# Altium PCB PCB_HDMI_To_FPC-v1.0.PcbDoc (part 3 of 3)
Units mil, origin at the board's own origin, x right, y up, seen from the top; angles counter-clockwise.
Board outline 2043 x 1400 mil, 2 copper layers (Top Layer, Bottom Layer), stack 61.811 mil thick; 121 components, 92 nets, 483 pads, 226 vias.
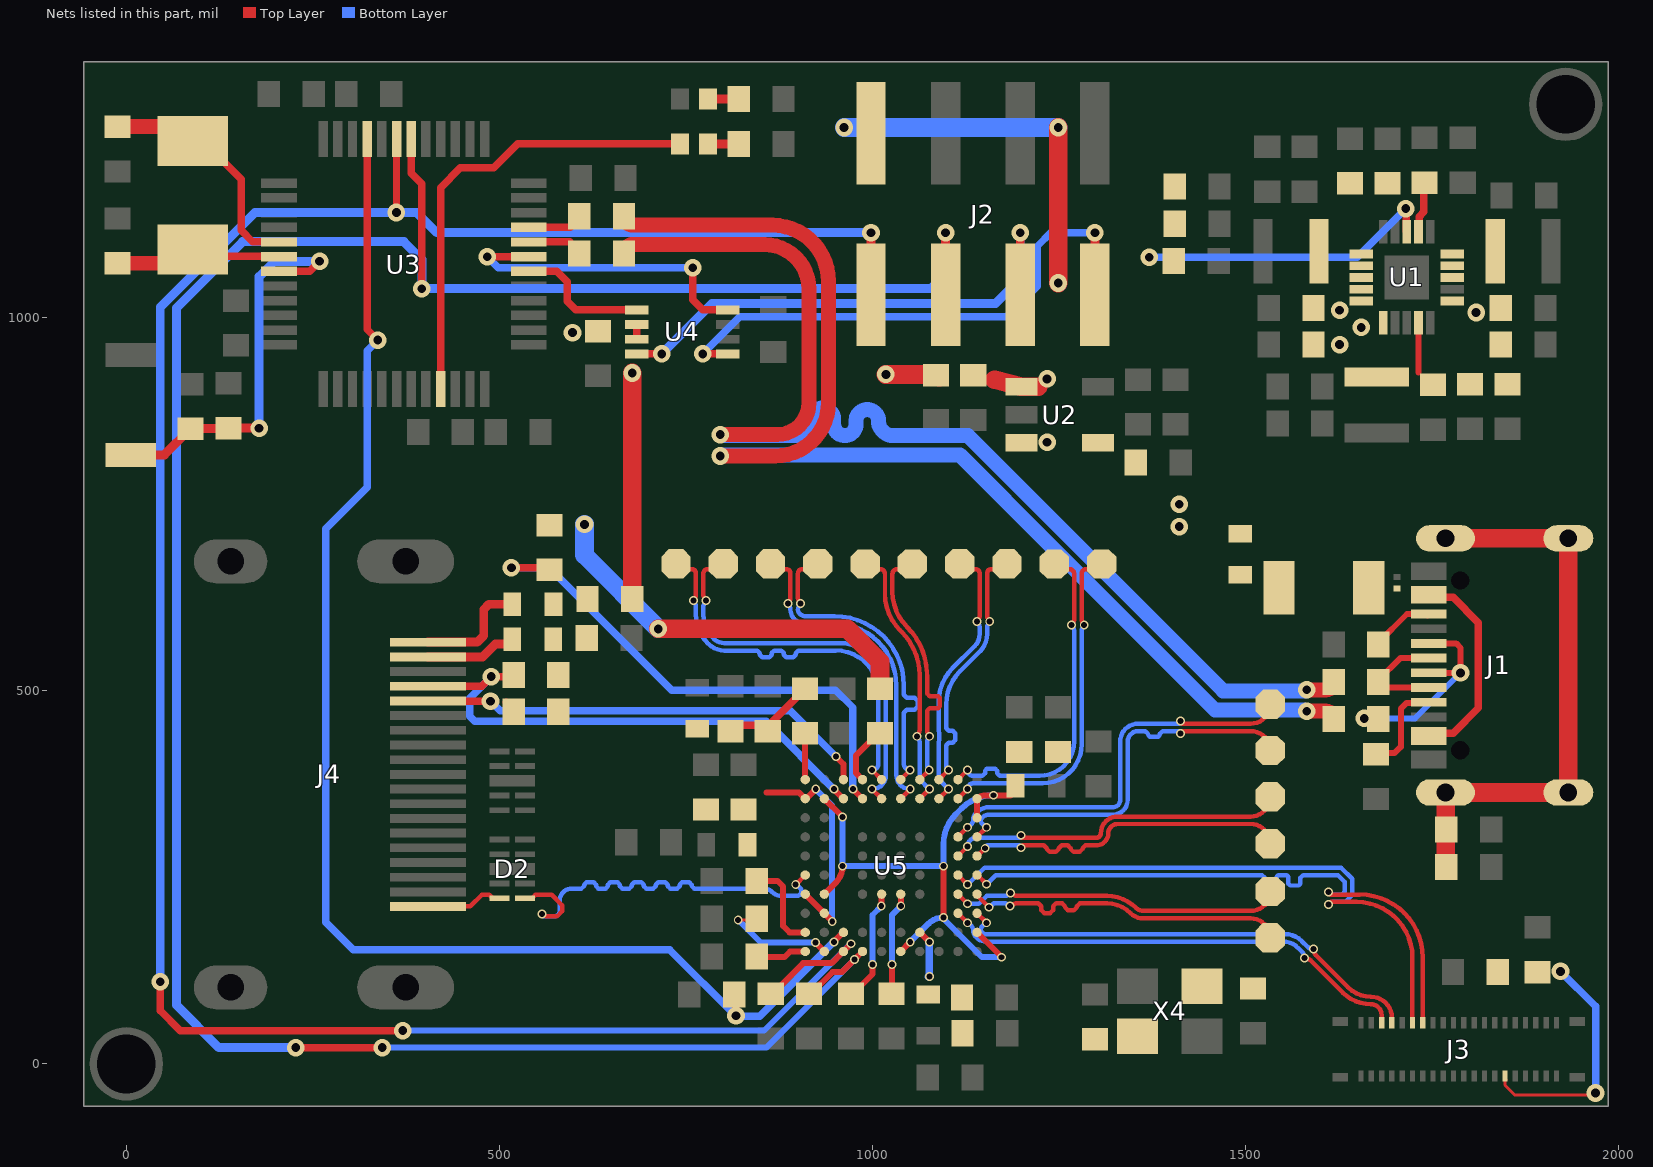
[diagram p2: the nets of this part, all layers, seen from the top]

## Via types
v1: diameter 23.62, hole 11.81, Top Layer to Bottom Layer, tented both sides, 130 vias
v2: diameter 11.81, hole 7.87, Top Layer to Bottom Layer, tented both sides, 96 vias

## Nets (pads, with @x,y where several pads share a name; then routed paths per layer and width w, separated by ;. In a path a pad name is that pad's centre, name@x,y a point inside that pad or via, vN(x,y) a via of type N, cw(c..) or ccw(c..) an arc to the next point about the centre after c; other vN are vias at no path point) (continued)
HDMID2_P: D2.5 D2.6 J4.1 U5.F1 | length 661.1
  Top Layer w6: J4.1@404.63,211.12 460.97,211.12 476.63,226.79 486.2,226.79 489.71,223.27 489.71,222.88 490.65,221.94 D2.5@500,221.94 ; D2.6@534.45,221.94 543.68,221.94 548.34,226.6 560.14,226.6 560.33,226.79 570,226.79 584,212.79 584,204.51 577.08,197.59 561.98,197.59 558.57,201 v2(557,201) ; v2(897.07,240.25) U5.F1@909.87,253.05
  Bottom Layer w6: v2(557,201) ccw(c560.41,201) 560.41,197.59 573,197.59 ccw(c573,205.59) 581,205.59 581,219.03 cw(c596.92,219.03) 585.66,230.29 585.73,230.36 cw(c596.94,219.15) 596.94,235 607,235 610,235 613.52,238.51 613.52,240.24 616.72,243.44 626.32,243.44 629.52,240.24 629.52,238.2 632.72,235 642.32,235 645.52,238.2 645.52,240.24 648.72,243.44 658.32,243.44 661.52,240.24 661.52,238.2 664.72,235 674.32,235 677.52,238.2 677.52,240.24 680.72,243.44 690.32,243.44 693.52,240.24 693.52,238.2 696.72,235 706.32,235 709.52,238.2 709.52,240.24 712.72,243.44 722.32,243.44 725.52,240.24 725.52,238.2 728.72,235 738.32,235 741.52,238.2 741.52,240.24 744.72,243.44 754.32,243.44 757.52,240.24 757.52,238.51 761.03,235 776.6,235 854.02,235 cw(c854.02,218.52) 865.68,230.17 ccw(c877.33,241.83) 877.33,225.35 898.87,225.35 ccw(c898.87,231.35) 903.11,227.1 ccw(c898.87,231.35) 904.87,231.35 ccw(c898.87,231.35) 903.11,235.59 899.42,239.28 ccw(c897.07,236.93) v2(897.07,240.25)
HPDI: R33.1 U5.A4 | length 80.3
  Top Layer w8: U5.A4@986.64,381 978,389.64 978,413.5 1007.5,443 R33.1@1010,443
HPDO: L5.2 R32.1 U5.B4 | length 715.2
  Top Layer w8: v2(973.84,368.21) U5.B4@986.64,355.41
  Top Layer w10: v1(516,665) 564,665 R32.1@567,662
  Bottom Layer w10: v1(516,665) 566.8,665 730.8,501 950.43,501 973.84,477.59 v2(973.84,368.21)
INT: R27.1 U3.45 U5.J3 | length 1906.3
  Top Layer w8: v2(948.25,163.48) U5.J3@961.05,176.28
  Top Layer w10: U3.45@322.79,1239.32 322.79,984.21 v1(337,970) ; R27.1@814.64,93.05 817,90.69 v1(817,64.43)
  Bottom Layer w10: v1(337,970) 323,956 323,773 267,717 267,190 304,153 728,153 816.57,64.43 v1(817,64.43) ; v1@817.04,64.04 848.81,64.04 v2(948.25,163.48)
MCU_RX: U3.31 U4.4 | length 432.6
  Top Layer w10: v1(483.76,1081.84) U3.31@539.32,1081.84 ; v1(759,1067) 759,1024 772.47,1010.53 U4.4@806.02,1010.53
  Bottom Layer w10: v1(483.76,1081.84) 498.6,1067 v1(759,1067)
MCU_TX: U3.30 U4.5 | length 181.3
  Top Layer w10: U3.30@539.32,1062.16 576.84,1062.16 591,1048 591,1022 602.47,1010.53 U4.5@683.98,1010.53
MIPI0_D0_N: J3.6 U5.H9 | length 636.7
  Top Layer w6: U5.H9@1114.59,201.87 v2(1127.39,189.07) ; v2(1579,142) ccw(c1581.68,144.68) 1581.68,140.89 cw(c1581.68,133.06) 1587.21,138.6 1630.17,95.65 ccw(c1667.95,133.44) 1667.95,80 ; 1668,80 cw(c1668,65.69) 1682.31,65.69 J3.6@1682.31,55.23
  Bottom Layer w6: v2(1127.39,189.07) cw(c1127.39,185.75) 1129.73,188.1 1131.96,185.87 cw(c1124.18,178.09) 1135.18,178.09 ccw(c1146.18,178.09) 1138.4,170.32 ; 1139.88,168.84 ccw(c1151.56,180.51) 1151.56,164 1550.45,164 cw(c1550.45,136.56) 1569.85,155.96 1576.19,149.63 cw(c1572.07,145.52) 1577.89,145.52 1577.89,144.68 ccw(c1581.68,144.68) v2(1579,142)
MIPI0_D0_P: J3.8 U5.H10 | length 641.2
  Top Layer w6: U5.H10@1140.18,201.87 v2(1152.98,189.07) ; v2(1590.89,153.89) cw(c1588.2,151.2) 1592,151.2 ccw(c1599.83,151.2) 1594.29,145.67 1637.2,102.76 ccw(c1668,133.56) 1668,90 cw(c1668,61.91) 1696.09,61.91 J3.8@1696.09,55.23
  Bottom Layer w6: v2(1152.98,189.07) ccw(c1152.98,185.75) 1150.63,188.1 1146.94,184.41 ccw(c1151.18,180.17) 1145.18,180.17 ccw(c1151.18,180.17) 1146.94,175.92 ccw(c1151.58,180.57) 1151.58,174 1552.52,174 cw(c1552.52,141.56) 1575.46,164.5 1583.26,156.7 ccw(c1587.37,160.81) 1587.37,155 1588.2,155 cw(c1588.2,151.2) v2(1590.89,153.89)
MIPI0_D1_N: P2.1 U5.G9 | length 450.9
  Top Layer w6: U5.G9@1114.59,227.46 v2(1127.39,214.66) ; v2(1185,229) cw(c1185,225.2) 1187.68,227.89 ccw(c1194.43,234.63) 1194.43,225.09 1314.45,225.09 cw(c1314.45,170.53) 1353.03,209.11 1353.07,209.07 ccw(c1362.9,218.9) 1362.9,205 1507,205 ccw(c1507,231) P2.1@1533,231
  Bottom Layer w6: v2(1127.39,214.66) 1142.7,214.66 1153.42,225.37 1179.8,225.37 1183.43,229 v2(1185,229)
MIPI0_D1_P: P1.1 U5.G10 | length 451.5
  Top Layer w6: U5.G10@1140.18,227.46 1140.18,225.84 v2(1156.16,209.87) ; v2(1184.28,211.47) ccw(c1184.28,215.27) 1186.96,212.58 cw(c1193.03,206.51) 1193.03,215.09 1203,215.09 1222,215.09 1226,211.09 1226,206.15 1230,202.15 1238,202.15 1242,206.15 1242,211.09 1246,215.09 1254,215.09 1258,211.09 1258,209.97 1262,205.97 1270,205.97 1274,209.97 1274,211.09 1278,215.09 1304.16,215.09 1314.39,215.09 cw(c1314.39,170.39) 1346,202 1346.06,201.94 ccw(c1362.81,218.69) 1362.81,195 1507,195 cw(c1507,169) P1.1@1533,169
  Bottom Layer w6: v2(1156.16,209.87) 1157.07,209.87 1162.58,215.37 1178.8,215.37 1182.71,211.47 v2(1184.28,211.47)
MIPI0_D2_N: P4.1 U5.E9 | length 465.7
  Top Layer w6: U5.E9@1114.59,278.64 v2(1127.39,291.43) ; v2(1199,306.41) ccw(c1202.41,306.41) 1202.41,303 1300,303 ccw(c1300,309) 1306,309 cw(c1328.5,309) 1328.5,331.5 1506.59,331.5 ccw(c1506.59,358) P4.1@1533.09,358
  Bottom Layer w6: v2(1127.39,291.43) cw(c1138.95,291.43) 1138.95,303 1195.59,303 ccw(c1195.59,306.41) v2(1199,306.41)
MIPI0_D2_P: P3.1 U5.E10 | length 452
  Top Layer w6: U5.E10@1140.18,278.64 1140.41,278.64 1150.77,289 v2(1151,289) ; v2(1199,289.59) cw(c1202.41,289.59) 1202.41,293 1210.48,293 1229.49,293 1233.49,289 1233.49,288.02 1237.49,284.02 1245.49,284.02 1249.49,288.02 1249.49,289 1253.49,293 1261.49,293 1265.49,289 1265.49,288.02 1269.49,284.02 1277.49,284.02 1281.49,288.02 1281.49,289 1285.49,293 1300,293 ccw(c1300,309) 1302.08,293.14 ccw(c1300,309) 1316,309 cw(c1328.5,309) 1328.5,321.5 1506.59,321.5 cw(c1506.59,295) P3.1@1533.09,295
  Bottom Layer w6: v2(1151,289) cw(c1155,289) 1155,293 1195.59,293 cw(c1195.59,289.59) v2(1199,289.59)
MIPI0_D3_N: P6.1 U5.D9 | length 554.4
  Top Layer w6: U5.D9@1114.59,304.23 v2(1127.39,317.03) ; v2(1413,459.41) ccw(c1416.41,459.41) 1416.41,456 1507.09,456 ccw(c1507.09,482) P6.1@1533.09,482
  Bottom Layer w6: v2(1127.39,317.03) ccw(c1127.39,320.34) 1129.73,318 1131.96,320.22 ccw(c1124.18,328) 1135.18,328 cw(c1146.18,328) 1138.4,335.77 ; 1138.4,335.78 1139.89,337.26 cw(c1156.15,321) 1156.15,344 1322,344 ccw(c1322,354) 1332,354 1332,432 cw(c1356,432) 1356,456 1409.59,456 ccw(c1409.59,459.41) v2(1413,459.41)
MIPI0_D3_P: P5.1 U5.D10 | length 546.4
  Top Layer w6: U5.D10@1140.18,304.23 v2(1152.98,317.03) ; v2(1413,442.59) cw(c1416.41,442.59) 1416.41,446 1507.02,446 cw(c1507.02,420) P5.1@1533.02,420
  Bottom Layer w6: v2(1152.98,317.03) cw(c1152.98,320.34) 1150.63,318 1146.94,321.69 cw(c1151.18,325.93) 1145.18,325.93 cw(c1151.18,325.93) 1146.94,330.17 cw(c1156.18,320.93) 1156.18,334 1322,334 ccw(c1322,354) 1342,354 1342,432 cw(c1356,432) 1349.76,444.53 cw(c1356,432) 1352.76,445.62 1356,446 1365.73,446 1369.24,442.49 1369.24,441 1371.64,438.6 1382.84,438.6 1385.24,441 1385.24,442.49 1388.76,446 1391.76,446 1409.59,446 cw(c1409.59,442.59) v2(1413,442.59)
MIPI0_DC_N: J3.12 U5.F9 | length 859.5
  Top Layer w6: U5.F9@1114.59,253.05 v2(1127.39,240.25) ; v2(1611,213.59) cw(c1614.41,213.59) 1614.41,217 1648.86,217 cw(c1648.86,142.2) 1723.65,142.2 1723.65,146.2 ; J3.12@1723.65,55.23 1723.65,145.2
  Bottom Layer w6: v2(1127.39,240.25) 1150.13,263 1628,263 1643,248 1643,226.37 1633.63,217 1615.98,217 1612.57,213.59 v2(1611,213.59)
MIPI0_DC_P: J3.14 U5.F10 | length 859.1
  Top Layer w6: U5.F10@1140.74,253.05 v2(1152.98,240.81) ; v2(1611,230.41) ccw(c1614.41,230.41) 1614.41,227 1653,227 cw(c1653,142.57) 1735.44,160.81 cw(c1653,142.57) 1737.43,142.57 1737.43,146.57 ; J3.14@1737.43,55.23 1737.43,145.57
  Bottom Layer w6: v2(1152.98,240.81) 1153.21,240.81 1165.4,253 1503,253 1522,253 1525.51,249.49 1525.51,241.16 1527.91,238.76 1539.11,238.76 1541.51,241.16 1541.51,250.6 1543.91,253 1555.11,253 1557.51,250.6 1557.51,241.48 1559.91,239.08 1571.11,239.08 1573.51,241.48 1573.51,249.49 1577.03,253 1604,253 1623.86,253 1633,243.86 1633,230.51 1629.49,227 1615.98,227 1612.57,230.41 v2(1611,230.41)
MIPI1_D0_N: P10.1 U5.B9 | length 468.1
  Top Layer w6: U5.B9@1114.59,355.41 v2(1127.39,368.21) ; v2(1283.71,588) ccw(c1279.92,588) 1282.61,590.68 1282.01,591.28 cw(c1286.12,595.39) 1280.31,595.39 1280.31,656.92 cw(c1286.31,656.92) 1282.06,661.17 cw(c1286.31,656.92) 1286.31,662.92 1291.87,662.92 ccw(c1291.87,682.36) 1305.61,668.62 P10.1@1307,670
  Bottom Layer w6: v2(1127.39,368.21) cw(c1135.18,368.21) 1135.18,376 1228,376 ccw(c1228,428.31) 1280.31,428.31 1280.31,579.78 cw(c1288.14,579.78) 1282.6,585.32 ccw(c1279.92,588) v2(1283.71,588)
MIPI1_D0_P: P9.1 U5.A9 | length 462.4
  Top Layer w6: U5.A9@1114.59,381 v2(1127.39,393.8) ; P9.1@1243.61,670 1245,668.62 ccw(c1258.74,682.36) 1258.74,662.92 1264.31,662.92 cw(c1264.31,656.92) 1268.55,661.17 cw(c1264.31,656.92) 1270.31,656.92 1270.31,595.39 cw(c1264.49,595.39) 1268.6,591.28 1268.01,590.68 ccw(c1270.7,588) v2(1266.9,588)
  Bottom Layer w6: v2(1127.39,393.8) ccw(c1135.18,393.8) 1135.18,386 1144.38,386 1147.38,386 1150.9,389.52 1150.9,392.99 1153.3,395.39 1164.5,395.39 1166.9,392.99 1166.9,389.52 1170.41,386 1179.2,386 1223.86,386 ccw(c1223.86,432.45) 1256.09,399 ccw(c1223.86,432.45) 1270.31,432.45 1270.31,579.78 ccw(c1262.48,579.78) 1268.01,585.32 cw(c1270.7,588) v2(1266.9,588)
MIPI1_D1_N: P12.1 U5.B8 | length 365.2
  Top Layer w6: U5.B8@1089,355.41 v2(1101.8,368.21) ; P12.1@1116.94,670.16 1118.32,668.78 ccw(c1132.06,682.52) 1132.06,663.09 1137.63,663.09 cw(c1137.63,657.09) 1141.87,661.33 cw(c1137.63,657.09) 1143.63,657.09 1143.63,600.39 cw(c1137.81,600.39) 1141.93,596.28 1141.33,595.68 ccw(c1144.02,593) v2(1140.22,593)
  Bottom Layer w6: v2(1101.8,368.21) 1090.65,379.35 cw(c1094.89,383.6) 1088.89,383.6 1088.89,427 cw(c1098.89,427) 1088.9,427.43 1089.38,438.44 ccw(c1076.48,439) 1089.38,439.61 1088.9,449.55 cw(c1098.89,450.03) 1088.89,450.03 1088.89,486.14 cw(c1151.05,486.14) 1107.1,530.1 1137,560 ccw(c1121,576) 1143.63,576 1143.63,584.78 ccw(c1135.8,584.78) 1141.33,590.32 cw(c1144.02,593) v2(1140.22,593)
MIPI1_D1_P: P11.1 U5.A8 | length 351.1
  Top Layer w6: U5.A8@1089,381 v2(1101.8,393.8) ; v2@1155.92,595.68 1155.33,596.28 cw(c1159.44,600.39) 1153.63,600.39 1153.63,657.09 cw(c1159.63,657.09) 1155.39,661.33 cw(c1159.63,657.09) 1159.63,663.09 1165.19,663.09 ccw(c1165.19,682.52) 1178.94,668.78 P11.1@1180.32,670.16 ; v2@1155.93,595.68 cw(c1153.24,593) v2(1157.03,593)
  Bottom Layer w6: v2(1101.8,393.8) 1101.8,395.37 1098.89,398.27 1098.89,408 1098.89,427 1102.41,430.52 1107.51,430.52 1110.71,433.72 1110.71,443.32 1107.51,446.52 1102.41,446.52 1098.89,450.03 1098.89,482 cw(c1161.05,482) 1117.1,525.95 1144.13,552.98 ccw(c1121.18,575.92) 1153.63,575.92 1153.63,584.78 cw(c1161.46,584.78) 1155.92,590.32 ccw(c1153.24,593) v2(1157.03,593)
MIPI1_D2_N: P14.1 U5.B6 | length 449.8
  Top Layer w6: P14.1@863.39,670.16 864.78,668.78 ccw(c878.52,682.52) 878.52,663.09 884.09,663.09 cw(c884.09,657.09) 888.33,661.33 cw(c884.09,657.09) 890.09,657.09 890.09,624.39 cw(c884.27,624.39) 888.38,620.28 887.79,619.68 ccw(c890.48,617) v2(886.68,617) ; U5.B6@1037.82,355.41 v2(1050.61,368.21)
  Bottom Layer w6: v2(886.68,617) ccw(c890.48,617) 887.79,614.32 cw(c882.25,608.78) 890.09,608.78 ; 890.09,608.75 ccw(c907.66,608.75) 895.23,596.32 895.34,596.21 ccw(c910.34,611.2) 910.34,590 949.3,590 cw(c949.3,507.3) 1032,507.3 1032,386.82 ccw(c1050.61,386.82) v2(1050.61,368.21)
MIPI1_D2_P: P13.1 U5.A6 | length 445.5
  Top Layer w6: v2(903.49,617) ccw(c899.69,617) 902.39,619.68 901.79,620.28 cw(c905.9,624.39) 900.09,624.39 900.09,657.09 cw(c906.09,657.09) 901.84,661.33 cw(c906.09,657.09) 906.09,663.09 911.65,663.09 ccw(c911.65,682.52) 925.39,668.78 P13.1@926.78,670.16 ; U5.A6@1037.82,381 1037.82,381.22 1050.17,393.58 v2(1050.17,393.8)
  Bottom Layer w6: v2@902.35,614.29 ccw(c907.83,608.82) 900.09,608.82 ccw(c907.83,608.82) 902.35,603.34 ccw(c910.42,611.41) 910.42,600 949.3,600 cw(c949.3,507.3) 1042,507.3 1042,494.68 1046,490.68 1056.41,490.68 1060.41,486.68 1060.41,478.68 1056.41,474.68 1046,474.68 1042,470.68 1042,451.68 1042,401.97 ccw(c1050.17,401.97) v2(1050.17,393.8) ; v2@902.38,614.32 ccw(c899.69,617) v2(903.49,617)
MIPI1_D3_N: P16.1 U5.B5 | length 555
  Top Layer w6: v2(776.79,621) ccw(c772.99,621) 775.68,623.68 775.09,624.28 cw(c779.2,628.39) 773.38,628.39 773.38,657.12 cw(c779.38,657.12) 775.14,661.36 cw(c779.38,657.12) 779.38,663.12 784.95,663.12 ccw(c784.95,682.56) 798.69,668.81 P16.1@800.08,670.2 ; v2(999.43,368.21) U5.B5@1012.23,355.41
  Bottom Layer w6: v2(776.79,621) cw(c772.99,621) 775.68,618.32 ccw(c781.21,612.78) 773.38,612.78 773.38,602.87 ccw(c819.87,602.87) 787,570 ccw(c801.49,584.49) 801.49,564 955.14,564 cw(c955.14,501.14) 1018,501.14 1018,386.77 cw(c999.43,386.77) v2(999.43,368.21)
MIPI1_D3_P: P15.1 U5.A5 | length 542.9
  Top Layer w6: P15.1@736.69,670.2 738.08,668.81 ccw(c751.82,682.56) 751.82,663.12 757.38,663.12 cw(c757.38,657.12) 761.63,661.36 cw(c757.38,657.12) 763.38,657.12 763.38,628.39 cw(c757.57,628.39) 761.68,624.28 761.09,623.68 ccw(c763.77,621) v2(759.98,621) ; v2(999.43,393.8) U5.A5@1012.23,381
  Bottom Layer w6: v2(759.98,621) ccw(c763.77,621) 761.09,618.32 cw(c755.55,612.78) 763.38,612.78 763.38,602.83 ccw(c819.77,602.83) 779.9,562.96 779.96,562.89 ccw(c801.44,584.36) 801.44,554 837,554 845.58,554 849.09,550.49 849.09,548.12 852.29,544.92 861.89,544.92 865.09,548.12 865.09,550.8 868.29,554 877.89,554 881.09,550.8 881.09,548.12 884.29,544.92 893.89,544.92 897.09,548.12 897.09,550.49 900.61,554 903.61,554 951,554 cw(c951,497) 1008,497 1008,402.36 cw(c999.43,402.36) v2(999.43,393.8)
MIPI1_DC_N: P8.1 U5.B7 | length 359
  Top Layer w6: P8.1@990.07,670 991.46,668.62 ccw(c1005.2,682.36) 1005.2,662.92 1010.76,662.92 cw(c1010.76,656.92) 1015.01,661.17 cw(c1010.76,656.92) 1016.76,656.92 1016.76,629.96 ccw(c1086.11,629.96) 1037.08,580.92 1039,579 cw(c980.87,520.87) 1063.08,520.87 1063.08,447.22 cw(c1055.25,447.22) 1060.79,441.68 ccw(c1063.47,439) v2(1059.67,439) ; U5.B7@1063.41,355.41 v2(1076.21,368.21)
  Bottom Layer w6: v2(1059.67,439) ccw(c1063.47,439) 1060.78,436.32 1061.38,435.72 cw(c1057.27,431.61) 1063.08,431.61 1063.08,381.33 v2(1076.21,368.21)
MIPI1_DC_P: P7.1 U5.A7 | length 356.3
  Top Layer w6: P7.1@1053.46,670 1052.07,668.62 cw(c1038.33,682.36) 1038.33,662.92 1032.76,662.92 ccw(c1032.76,656.92) 1028.52,661.17 ccw(c1032.76,656.92) 1026.76,656.92 1026.76,632.68 ccw(c1092.68,632.68) 1046.07,586.07 1046.19,585.95 cw(c981.28,521.04) 1073.04,523.65 cw(c981.28,521.04) 1073.08,521.04 1073.08,496.38 1076.59,492.86 1087.85,492.86 1090.25,490.46 1090.25,479.26 1087.85,476.86 1076.59,476.86 1073.08,473.35 1073.08,454.35 1073.08,447.22 ccw(c1080.91,447.22) 1075.37,441.68 cw(c1072.69,439) v2(1076.48,439) ; U5.A7@1063.41,381 1063.41,381.11 1075.98,393.69 v2(1075.98,393.8)
  Bottom Layer w6: v2@1075.37,436.32 1074.78,435.72 ccw(c1078.89,431.61) 1073.08,431.61 1073.08,398.27 1075.98,395.37 v2(1075.98,393.8) ; v2@1075.38,436.32 ccw(c1072.69,439) v2(1076.48,439)
NetC3_1: C3.1 R2.1 R4.2 U1.14 | length 68.7
  Top Layer w8: 1731.75,926.75 U1.14@1731.75,992.98 ; C3.1@1748.5,910 C3.1@1751,910
NetC6_1: C6.1 R3.1 R5.2 U1.3 | length 402.4
  Top Layer w10: v1(1714.67,1146.19) 1715.34,1145.53 1715.34,1115.69 U1.3@1716,1115.02
  Bottom Layer w10: v1(1371,1081) 1649.48,1081 v1(1714.67,1146.19)
NetC11_1: C11.1 R7.1 R8.2 U1.2 | length 69.4
  Top Layer w10: U1.2@1731.75,1115.02 1732.59,1115.87 1732.59,1135.6 1738.86,1141.87 1738.86,1179.86 C11.1@1740,1181
NetC18_2: C18.2 U2.4
NetC19_2: C19.2 J1.S1 J1.S2 J1.S3 J1.S4 R11.2 | length 773.6
  Top Layer w20: J1.S4@1767.94,363.72 J1.S4@1768.47,363.19 ; R11.2@1768.47,264.53 R11.2@1769,264 ; J1.S3@1931.5,363.72 J1.S3@1934.87,363.72 ; J1.S2@1932.5,704.28 J1.S2@1934.87,704.28
  Top Layer w25: J1.S4@1767.94,363.72 J1.S3@1931.5,363.72 ; J1.S1@1767.94,704.28 J1.S2@1931.5,704.28 ; R11.2@1768.47,264.53 J1.S4@1768.47,363.19 ; J1.S3@1932.5,363.72 J1.S2@1932.5,704.28
NetC30_2: C30.2 C31.2 FB2.1 U5.B1 U5.G1 U5.H2 | length 312.6
  Top Layer w4: U5.H2@935.46,201.71 U5.H2@935.46,201.87 ; v2(946,191) v2@946,191.16
  Top Layer w8: 857.98,364 901.28,364 U5.B1@909.87,355.41 911.16,355.41 v2(923.96,368.2) ; U5.G1@909.87,227.46 U5.H2@935.46,201.87 ; U5.H2@935.46,201.71 v2@946,191.16
  Bottom Layer w8: v2(923.96,368.2) 946,346.16 v2(946,191)
NetC33_2: C33.2 C34.2 FB3.1 U5.B2 U5.B10 U5.C10 U5.G2 U5.J10 U5.K6 | length 786.1
  Top Layer w8: U5.G2@935.46,227.46 950.65,242.65 ccw(c928.29,265) v2(959.91,265) ; U5.B2@935.46,355.41 v2(959.91,331) ; U5.K6@1037.82,150.69 v2(1050.61,163.48) ; v2(1095,196) v2(1095,265) ; U5.J10@1140.18,176.28 1140.18,176.05 1173,143.23 v2(1173,143) ; U5.C10@1140.18,329.82 U5.B10@1140.18,355.41 cw(c1151.26,344.33) 1151.26,360 v2(1162,360) FB3.1@1184.73,360 ; FB3.1@1184.73,361.3 FB3.1@1191.64,368.21
  Bottom Layer w8: v2(959.91,331) v2(959.91,265) v2(1095,265) 1095,293.99 cw(c1152.96,293.99) 1111.95,334.95 1119.32,342.32 cw(c1162,299.64) v2(1162,360) ; v2(1050.61,163.48) 1075.45,188.32 cw(c1094,169.76) v2@1094,196 ; v2@1093.87,195.87 1146.75,143 v2(1173,143)
NetC36_2: C36.2 C37.2 FB4.1 U5.J7 | length 65.1
  Top Layer w8: U5.J7@1063.41,176.28 v2(1076.21,163.48)
  Bottom Layer w10: v2@1075,117 1076.21,118.21 v2(1076.21,163.48)
  other v2: 1076.21,117
NetC38_2: C38.2 U5.J1 | length 124.8
  Top Layer w8: C38.2@844.64,245.05 872.95,245.05 880,238 880,185 888.72,176.28 U5.J1@909.87,176.28
NetC39_2: C39.2 U5.K1 | length 68.8
  Top Layer w6: C39.2@844.64,144.05 C39.2@845.69,143
  Top Layer w8: C39.2@845.69,143 882,143 889.69,150.69 U5.K1@909.87,150.69
NetC40_2: C40.2 U5.K2 | length 158.5
  Top Layer w4: v2(820,193) 843.09,193 C40.2@844.64,194.55
  Top Layer w8: v2(923.81,162.76) 923.81,162.55 935.46,150.9 U5.K2@935.46,150.69
  Bottom Layer w8: v2(820,193) 850.24,162.76 v2(923.81,162.76)
NetC41_2: C41.2 C42.2 FB5.1 R28.2 | length 115.2
  Top Layer w10: C41.2@815,454 861,454 897.14,490.14 897.14,493 907.64,503.5 R28.2@908,503.5
NetD1_1: D1.1 F1.1 J1.A4/B9 J1.B4/A9 | length 281.1
  Top Layer w10: J1.A4/B9@1745.5,439.51 1749.24,443.26 1778.26,443.26 1812,477 1812,591.43 1778.14,625.29 1748.69,625.29 J1.B4/A9@1745.5,628.49
  Top Layer w20: F1.1@1665,641 F1.1@1667,639
NetF1_2: F1.2 FB1.1
NetJ1_A5: J1.A5 R12.1 | length 129.3
  Top Layer w8: R12.1@1675,415 1676.81,416.81 1699.81,416.81 1708,425 1708,476.07 1715.86,483.93 1744.64,483.93 J1.A5@1745.5,484.79
NetJ1_A6: J1.A6 J1.B6 R10.1 | length 296.4
  Top Layer w8: v1(1659,463) 1677,463 R10.1@1678,462 ; J1.A6@1745.5,524.16 v1@1787.84,524.16 ; J1.B6@1745.5,563.53 1782.14,563.53 1788,557.67 v1(1788,524) 1788,523 v1@1787.42,523.58
  Bottom Layer w8: v1(1659,463) 1727,463 v1(1788,524)
NetJ1_A7: J1.A7 J1.B7 R9.1 | length 152.8
  Top Layer w8: J1.B7@1745.5,504.47 1685.53,504.47 R9.1@1678,512 1678,514.5 1707.34,543.84 J1.A7@1745.5,543.84
NetJ1_B5: J1.B5 R13.1 | length 88.6
  Top Layer w8: R13.1@1678,562 1678,564.5 1716.4,602.9 J1.B5@1745.5,602.9 J1.B5@1743.59,600.99
NetJ4_18: J4.18 L4.1 | length 122.8
  Top Layer w12: J4.18@404.3,545.51 477.38,545.51 494.43,562.56 511.19,562.56 517,568.37 L4.1@517,569
NetJ4_19: J4.19 L5.1 | length 154.7
  Top Layer w12: J4.19@404.3,565.2 470.2,565.2 479,574 479,608.97 486.03,616 L5.1@517.44,616
NetL1_1: L1.1 U1.11
NetL2_1: L2.1 U1.6
NetL3_1: L3.1 U1.20
NetLED1_1: LED1.1 R1.2 | length 41.3
  Top Layer w12: LED1.1@779.4,1293 R1.2@820.7,1293
NetLED2_1: LED2.1 R6.2 | length 41.3
  Top Layer w12: LED2.1@779.4,1233 R6.2@820.7,1233
NetR17_2: R17.2 U3.32 | length 75.6
  Top Layer w10: U3.32@539.32,1101.53 593.97,1101.53 607,1088.5 R17.2@607,1086
NetR18_2: R18.2 U3.33 | length 75.3
  Top Layer w10: U3.33@539.32,1121.21 594.71,1121.21 607,1133.5 R18.2@607,1136
NetR22_2: R22.2 U5.G5 | length 151.2
  Top Layer w8: R22.2@971.3,94.05 973.8,94.05 984.8,105.05 1000,120.24 v2(1000,133) ; v2(1011.82,211.41) U5.G5@1011.82,227.05
  Bottom Layer w8: v2(1000,133) 1000,199.59 v2(1011.82,211.41)
NetR23_2: R23.2 U5.G6 | length 138.6
  Top Layer w8: R23.2@1025.64,94.05 1026,94.41 v2(1026,133) ; U5.G6@1037.82,227.46 1038,227.28 v2(1038,211.41)
  Bottom Layer w8: v2(1026,133) 1026,199.41 v2(1038,211.41)
NetR24_2: R24.2 X4.3
NetR28_1: R28.1 U5.A1 | length 62.1
  Top Layer w8: U5.A1@909.87,381 909.87,418 R28.1@909.87,442.77
  Top Layer w10: R28.1@909.64,443 R28.1@909.87,442.77
NetR35_2: R35.2 X4.1
OSC_IN: C26.2 U3.5 X1.1 | length 318.7
  Top Layer w10: X1.1@89,1236.83 102.78,1236.83 154,1185.61 154,1117 169.47,1101.53 U3.5@204.68,1101.53
  Top Layer w20: C26.2@-12,1256 X1.1@69.83,1256
  Top Layer w25: X1.1@71.33,1254.5 X1.1@89,1236.83
OSC_OUT: C25.2 U3.6 X1.2 | length 228.1
  Top Layer w10: X1.2@98.02,1082.14 U3.6@204.38,1082.14
  Top Layer w12: X1.2@89,1091.17 X1.2@98.02,1082.14 ; U3.6@204.38,1082.14 U3.6@204.68,1081.84
  Top Layer w20: C25.2@-12,1073 70.83,1073 X1.2@89,1091.17
R_DDC_SCL: J4.15 R29.1 U5.A3 | length 631.1
  Top Layer w8: v2(951,412) 961.05,401.95 U5.A3@961.05,381
  Top Layer w10: J4.15@404.3,486.44 404.52,486.22 v1@487.78,486.22 ; v1(488,486) v1@489.5,484.5 ; R29.1@509,484.5 519,474.5 R29.1@519,472
  Bottom Layer w10: v1(488,486) 501,473 890,473 v2(951,412)
R_DDC_SDA: J4.16 R30.1 U5.B3 | length 732.7
  Top Layer w8: v2(948.25,368.21) U5.B3@961.05,355.41
  Top Layer w10: J4.16@404.3,506.13 476.13,506.13 v1(489,519) 517,519 R30.1@519,521
  Bottom Layer w10: v1(489,519) 460,490 460,466 467,459 857.46,459 v2(948.25,368.21)
R_I2C_SCL: J2.6 R25.2 U3.42 U5.K4 | length 3480.5
  Top Layer w8: R25.2@914.97,94.05 917.47,94.05 946.42,123 959,123 v2(976,140) U5.K4@986.64,150.69
  Top Layer w10: v1(227,21.81) v1(343,21.81) ; U3.42@381.84,1239.32 381.84,1193.83 396,1179.67 v1(396,1038.89)
  Top Layer w12: J2.6@1098,1030.73 v1(1098,1114)
  Bottom Layer w8: v1(343,21.81) 857.81,21.81 v2(976,140)
  Bottom Layer w12: v1(227,21.81) 124.19,21.81 67.31,78.69 67.31,1013.31 156,1102 372,1102 396,1078 v1(396,1038.89) 1078.15,1038.89 1098,1058.74 v1(1098,1114)
R_I2C_SDA: J2.8 R26.2 U3.43 U5.K3 | length 3260.9
  Top Layer w8: R26.2@863.64,94.05 866.14,94.05 907.09,135 945.36,135 U5.K3@961.05,150.69 v2@971,160.64
  Top Layer w10: v1(45.5,110) 45.5,71.51 72.39,44.62 v1(370.43,44.62) ; v1(362,1141) 362.08,1141.08 362.08,1239.24 U3.43@362.16,1239.32
  Top Layer w12: J2.8@998,1030.73 v1(998,1114)
  Bottom Layer w8: v1(370.43,44.62) 854.62,44.62 v2(971,161)
  Bottom Layer w12: v1@45.5,111 45.5,1014.13 172.37,1141 v1@363.63,1141 ; v1(362,1141) 389,1141 416,1114 v1(998,1114)
REST: J3.29 R21.2 SB1.2 | length 328.8
  Top Layer w4: J3.29@1849.21,-21.91 J3.29@1847.67,-16.43 1847.67,-28.48 1861.19,-42 1966.66,-42 1969,-39.66 v1(1969,-39)
  Bottom Layer w10: v1(1922,124) 1969,77 v1(1969,-39)
RST: C20.1 R14.2 SW1.1 U3.7 | length 538.6
  Top Layer w10: U3.7@204.68,1062.16 245.58,1062.16 v1(259,1075.57)
  Top Layer w12: SW1.1@6,816.07 51.07,816.07 C20.1@86,851 86.5,851.5 111.5,851.5 R14.2@136.5,851.5 ; R14.2@137,852 v1(178,852)
  Bottom Layer w12: v1(178,852) 178,1055 198.57,1075.57 v1(259,1075.57)
UART1-Rx: J2.2 U4.1 | length 741.2
  Top Layer w10: v1(772.53,951.47) U4.1@806.02,951.47
  Top Layer w12: J2.2@1298,1030.73 v1(1298,1114)
  Bottom Layer w10: v1(772.53,951.47) 822.26,1001.21 1180.21,1001.21 1221.14,1042.14 1221.14,1096.14 1239,1114 v1(1298,1114)
UART1-Tx: J2.4 U4.8 | length 700.9
  Top Layer w10: U4.8@683.98,951.47 v1(717.47,951.47)
  Top Layer w12: J2.4@1198,1030.73 v1(1198,1114)
  Bottom Layer w12: v1(717.47,951.47) 785.21,1019.21 1165.21,1019.21 1198,1052 v1(1198,1114)
USB_N: R9.2 R17.1 | length 1643.1
  Top Layer w20: R17.1@667,1086 cw(c679,1086) 679,1098 855,1098 cw(c855,1038) 915,1038 915,886 cw(c872.31,886) 872.31,843.31 v1(796,843.31) ; v1(1582,501.31) 1607.31,501.31 ccw(c1607.31,512) R9.2@1618,512
  Bottom Layer w20: v1(796,843.31) 798.56,843.31 799.87,842 828,842 898,842 ccw(c898,862) 918,862 918,863.8 cw(c933,863.8) 948,863.8 948,857 ccw(c963,857) 978,857 978,862 cw(c993,862) 1008,862 ccw(c1028,862) 1028,842 1076,842 1128,842 1470,500 1580.69,500 v1(1582,501.31)
USB_P: R10.2 R18.1 | length 1643.1
  Top Layer w20: R18.1@667,1136 ccw(c679,1136) 679,1124 865.77,1124 cw(c865.77,1048.77) 941,1048.77 941,886 cw(c869.69,886) 869.69,814.69 v1(796,814.69) ; v1(1582,472.69) 1607.31,472.69 cw(c1607.31,462) R10.2@1618,462
  Bottom Layer w20: v1(796,814.69) 797.31,816 1117.23,816 1241.33,691.9 1255.62,677.62 1459.23,474 1578.13,474 1579.44,472.69 v1(1582,472.69)
USR_LED: LED2.2 U3.21 | length 614.7
  Top Layer w10: U3.21@421.21,904.68 421.21,1174.21 447.76,1200.76 492.62,1200.76 524.87,1233 LED2.2@742,1233
VBUS: C1.2 C2.2 C9.2 C10.2 C14.1 C16.1 C28.1 FB1.2 J2.7 R31.1 U1.7 U1.8 U1.9 U1.10 U1.16 U1.18 U1.19 U2.1 U2.3 U4.6 U4.7 | length 963.5
  Top Layer w10: C28.1@632,982 C28.1@640.84,990.84 ; U4.7@683.98,971.16 U4.6@683.98,990.84
  Top Layer w25: R31.1@678,623 v1(678,926) ; v1(1018,924) 1086.03,924 C16.1@1089.53,920.5 ; 1163.51,917 1199.82,907.5 U2.1@1199.82,907.4 1199.92,907.5 1222,907.5 ; v1(1249,1046.5) v1(1249,1255)
  Bottom Layer w25: v1(962,1255) v1(1249,1255)
  other v1: 1411,720 1411,750 1234,833 1234,918 1626,964 598,980 1655,987 1809,1007 1626,1010
VDD_HDMI_5V: C43.2 L4.2 R29.2 R30.2 R31.2 R32.2 R33.2 | length 532.7
  Top Layer w25: R31.2@618,622.5 R31.2@618,623 ; v1(713,583) 966,583 1010,539 R33.2@1010,503
  Bottom Layer w25: v1(614,723) 614,682 v1(713,583)
pads on no net: J1.A8 J1.B8 J1.MH J3.3 J3.5 J3.17 J3.30 J3.33 J3.34 J3.35 J3.36 J3.37 J4.14 U3.2 U3.3 U3.4 U3.10 U3.11 U3.12 U3.13 U3.14 U3.15 U3.16 U3.17 U3.18 U3.19 U3.22 U3.25 U3.26 U3.27 U3.28 U3.29 U3.38 U3.39 U3.40 U3.41 U5.J2 U5.J4 U5.J5 U5.J6 U5.J8 U5.J9 U5.K5 U5.K7

## Polygon pours and split planes (outlines as drawn)
GND on Top Layer "GND_L01_P003" (solid, remove dead copper, pour order 3): -57,-57 -57,1343 1986,1343 1986,-57
1V8 on Top Layer "1V8_L01_P007" (solid, remove dead copper, pour order 7): 1761,96.5 1761,57 1783,57 1783,93 1796,106 1796,182 1763.5,182 1761,182
1V1 on Top Layer "1V1_L01_P001" (solid, remove dead copper, pour order 1): 1886,1227 1886,1045 1931,1045 1931,1225 1931,1227 1898,1260 1668,1260 1668,1215 1886,1215
NetL1_1 on Top Layer "NETL1_1_L01_P002" (solid, remove dead copper, pour order 2): 1678,1009 1678,941 1627,941 1627,898 1719,898 1719,941 1692,941 1692,1008 1692,1009 1687,1009
3V3 on Top Layer "3V3_L01_P000" (solid, remove dead copper, pour order 0): 181,1224 181,1212 181,1173 245,1173 270,1198 270,1321 233,1321 233,1276
GND on Bottom Layer "GND_L02_P004" (solid, remove dead copper, pour order 4): -57,-57 -57,1343 1986,1343 1986,-57
VBUS on Bottom Layer "VBUS_L02_P005" (solid, remove dead copper, pour order 5): 1455,940 1427.27,940 1427.27,706.27 1427,706 1332,706 1129,909 581,909 581,1016.28 1189.28,1016.28 1237,1064 1670,1064 1670,1020 1853,1020 1853,940

## Other copper
Top Layer:
  rectangle net 3V3: 1775,-28 1810,-12
  rectangle net 3V3: 1790,52.23 1809,89
  rectangle net BOOT_1: 337.24,1279.74 370,1317.74
  rectangle net BOOT_0: 375,829 407.53,867
  rectangle net VBUS: 1761,945 1856,1024
  region net VBUS: 1395,765 1395,697 1512,697 1512,765
  rectangle net NetF1_2: 1428,600 1579,674
  rectangle net NetC41_2: 888,483 928,519
  rectangle net NetR35_2: 1409,80 1529,132
  rectangle net 3V3: 1409,-45 1562,63
  rectangle net HDMID2_P: 486,217.26 548,226.26
  rectangle net HDMID2_N: 486,236.94 548,245.94
  rectangle net HDMID1_P: 486,276.32 548,285.32
  rectangle net HDMID1_N: 486,296 548,305
  rectangle net HDMID0_P: 486,335.26 548,344.26
  rectangle net HDMID0_N: 486,354.94 548,363.94
  rectangle net HDMIC_P: 486,394.32 548,403.32
  rectangle net HDMIC_N: 486,414 548,423
  rectangle net NetJ1_A6: 1647,443 1694,482
  rectangle net 1V8: 1798,784 1882,813
  rectangle net GND: 791,490 878,535
  rectangle net R_DDC_SCL: 477,454 536,493
  rectangle net NetC41_2: 888,488 928,519
  rectangle net CEC: 941,428 978,478
  rectangle net 3V3: 697,-42 936.33,38
  rectangle net 3V3: 844.33,18 936.33,49
  rectangle net 3V3: 697,25 721,315
  rectangle net NetC18_2: 1276,789.82 1326,849
  rectangle net 1V8: 1763,103 1796,141
  rectangle net REST: 1821,104 1935,141
  rectangle net GND: 1116,-42 1202,4
  rectangle net GND: 1156,-42 1202,109
  rectangle net GND: 736,72 773,126
  rectangle net GND: 736,122 800,264
  rectangle net 3V3: 697,277 791,315
  rectangle net NetC40_2: 813,175 862,217
  rectangle net NetC30_2: 818,278 872,361
  rectangle net NetC30_2: 755,324 868,368
  rectangle net 1V1: 1235,352 1416,389
  rectangle net GND: 1771,1146 1861,1196
  rectangle net VBUS: 1178,818 1250,847
  rectangle net HPDO: 549,597 589,677
  rectangle net VDD_HDMI_5V: 548,707 625,740
  rectangle net VDD_HDMI_5V: 597,452 631,740
  rectangle net VDD_HDMI_5V: 556,452 630,588
  rectangle net GND: 952,18 1044,49
  rectangle net 1V8: 1057,-42 1092,50
  rectangle net NetC36_2: 1055,77 1135,123
  rectangle net NetC36_2: 1105,23 1135,107
  rectangle net GND: 1445,1154 1484,1243
  rectangle net GND: 1445,1218 1661,1260
  rectangle net NetC41_2: 745,430 885,478
  rectangle net NetD1_1: 1642,601 1685,674
  rectangle net NetD1_1: 1655,616 1769,641
  region net NetC6_1: 1420,1057 1420,1194 1360,1194 1360,1057
  rectangle net 3V3: 1445,1044 1546,1145
  rectangle net NetL3_1: 1820.2,1044 1857.2,1133
  rectangle net NetL2_1: 1584,1044 1621,1133
  rectangle net 3V3: 1508,1148 1605,1188
  rectangle net 3V3: 1508,1044 1546,1188
  rectangle net 1V8: 1580,784 1618,928
  rectangle net 1V8: 1589,784 1819,866
  rectangle net NetC3_1: 1727,894 1871,927
  rectangle net VBUS: 1576,946 1647,1031
  rectangle net VBUS: 1639,946 1671,1069.75
  region net NetL2_1: 1671,1133 1584,1133 1584,1082 1671,1082
  rectangle net NetC11_1: 1622,1167 1758,1197
  rectangle net VBUS: 1826,945 1857,1024
  rectangle net VBUS: 1802,1013 1813,1072
  rectangle net VBUS: 1761,1052 1813,1072
  rectangle net NetL3_1: 1761,1081 1848,1093
  region net NetR24_2: 1386,9 1386,62 1280,62 1280,9
  rectangle net NetC33_2: 1177,403 1270,434
  rectangle net NetC33_2: 1177,356 1215,434
  region net NetC18_2: 1367.98,824 1282,824 1282,789.82 1367.98,789.82
  region net GND: 1462,785 1462,872 1394.82,872 1394.82,785
  rectangle net GND: 1333.02,839.68 1427,871.68
  rectangle net GND: 1042,857 1222,882.4
  rectangle net VBUS: 1064.02,895 1250,939
  rectangle net GND: 1042,835 1157.18,869.4
  rectangle net 2V8: 1277.02,893.18 1491,939
  region net VBUS: 1019,1178 1019,1316 948.6,1316 948.6,1178
  rectangle net 3V3: 515.02,1174.18 624,1206.18
  rectangle net VBUS: 583,965 700,997

## Silkscreen, mask and mechanical layers (free items; w line width, h text height)
Top Overlay:
  lines w5: 717,260 748,260 759.5,271.5 ; 826,530.05 826,563.05 821,558.05 832,558.05 827,563.05 ; 864,1137 869,1132 869,1143 864,1138 ; 926,526 926,559 921,554 932,554 927,559 ; 1093,22 1093,11 1202,11 1210,3 ; 1201,34 1211.06,34 ; 1385,1105 1374,1105 1374,1000 1386,988 ; 1480,529.87 1594.89,529.87 ; 1493,1247 1488,1242 1499,1242 1494,1247 ; 1494,1243 1494,1129 1505,1129 ; 1682.95,318.88 1682.95,333.88 ; 1740.34,1260 1740.34,1275 ; 1848,313.95 1860.12,313.95 ; 1922,1002.42 1931.58,1002.42
  lines w7: 1338,634 1260.14,634 704,634 704,704 1330.14,704 1339,704 1339,634 ; 1498,134 1568,134 1568,517 1498,517 1498,212.86 1498,135 ; 1568,172 1568,180.86
  lines w8: 471,636 471,589 491,569 ; 867,1137 900,1137 920,1157 920,1250 898.7,1271.3
  text "*" at 1546,1297.18 h70 r180
  text "$" at 376,1286.04 h45
  text "PWR" at 585,1275 h55
  text "*" at 220.18,1255 h70 r90
  text "^" at 1573,1234.76 h57
  text "*" at 1852,1235.18 h70 r180
  text "^" at 1816,1218.76 h57
  text "*" at 735.17,1176.76 h70 r90
  text "^" at 1483,992.76 h57
  text "*" at 1319.82,963 h70 r270
  text "*" at 146.18,949 h70 r90
  text "*" at 1177.18,945 h70 r90
  text "^" at 1483,943.76 h57
  text "^" at 1926,929.76 h57
  text "*" at 902.18,908 h70 r90
  text "*" at 631.18,907 h70 r90
  text "^" at 1036,901.76 h57
  text "^" at 1432,893.76 h57
  text "*" at 1497,871.82 h70
  text "*" at 624.18,836 h70 r90
  text "$" at 350,833.04 h45
  text "^" at 1496,829.76 h57
  text "$" at 126.38,797.45 h45
  text "D3P" at 750.47,709.23 h45 r90
  text "D3N" at 813.96,709.23 h45 r90
  text "D2N" at 876.92,709.23 h45 r90
  text "D2P" at 939.89,709.23 h45 r90
  text "DCN" at 1003.73,709.23 h45 r90
  text "DCP" at 1067.57,709.23 h45 r90
  text "D1N" at 1130.53,709.23 h45 r90
  text "D1P" at 1193.49,709.23 h45 r90
  text "D0P" at 1256.98,709.23 h45 r90
  text "D0N" at 1320.47,709.23 h45 r90
  text "MIPI1" at 1232.73,597 h50
  text "^" at 699,535.76 h57
  text "*" at 903.82,528.05 h70 r90
  text "$" at 950,528.04 h45
  text "*" at 1222.82,502.05 h70 r90
  text "D3N" at 1418.33,466.53 h45
  text "^" at 1329,410.76 h57
  text "D3P" at 1418.33,401.53 h45
  text "D2N" at 1419.82,345 h45
  text "^" at 654,304.76 h57
  text "*" at 852,299.82 h70
  text "D2P" at 1419.23,280 h45
  text "*" at 785.18,227.05 h70 r90
  text "D1N" at 1418.33,215 h45
  text "*" at 785.18,184 h70 r90
  text "$" at 1835,153.04 h45
  text "D1P" at 1418.33,149 h45
  text "MIPI0" at 1572.82,134.99 h50
  text "*" at 785.18,133 h70 r90
  text "*" at 1222.18,115 h70 r90
  text "$" at 1536,87.04 h45
  text "$" at 855.02,-19.5 h45
  text "$" at 910.02,-19.5 h45
  text "$" at 961.02,-19.5 h45
  text "$" at 1012.02,-19.5 h45
  text "V1.0" at 63.58,-44.68 h75
  text "^" at 1158,-55.24 h57
Bottom Overlay:
  drawing of 16 lines, arcs and shapes, not listed
  text "Note:" at 275.01,374.39 h75
  text "*>> 0.1uF" at 280.18,305.25 h75
  text "^ >> 10uF" at 280.18,242.61 h75
  text "$ >> 10K" at 280.16,171.08 h75
Board_Outline:
  the board outline again, w10
Fabrication:
  drawing of 191 lines, arcs and shapes, not listed
  text "Layer" at 2342.09,747 h60
  text "Name" at 2752,747 h60
  text "Material" at 3681.74,747 h60
  text "Thickness" at 4541.51,747 h60
  text "Constant" at 5191.35,747 h60
  text "Board Layer Stack" at 5761.21,747 h60
  text "Top Overlay" at 2752,627 h60
  text "Top Solder" at 2752,507 h60
  text "Solder Resist" at 3681.74,507 h60
  text "0.39mil" at 4541.51,507 h60
  text "3.5" at 5191.35,507 h60
  text "1" at 2342.09,387 h60
  text "Top Layer" at 2752,387 h60
  text "1.38mil" at 4541.51,387 h60
  text "Core" at 2752,267 h60
  text "FR-4" at 3681.74,267 h60
  text "59.06mil" at 4541.51,267 h60
  text "4.8" at 5191.35,267 h60
  text "2" at 2342.09,147 h60
  text "Bottom Layer" at 2752,147 h60
  text "1.38mil" at 4541.51,147 h60
  text "Bottom Solder" at 2752,27 h60
  text "Solder Resist" at 3681.74,27 h60
  text "0.39mil" at 4541.51,27 h60
  text "3.5" at 5191.35,27 h60
  text "Bottom Overlay" at 2752,-93 h60
  text "Total board thickness:" at 2342.09,-213 h60
  text "62.60mil" at 4541.51,-213 h60
Drill Drawing:
  circle w10: c2364.62,2243.28 r33.33
  lines w10: 2331.29,1309.94 2331.29,1326.61 2347.96,1343.28 2331.29,1359.94 2331.29,1376.61 2347.96,1376.61 2364.62,1359.94 2381.29,1376.61 2397.96,1376.61 2397.96,1359.94 2381.29,1343.28 2397.96,1326.61 2397.96,1309.94 2381.29,1309.94 2364.62,1326.61 2347.96,1309.94 2331.29,1309.94 ; 2331.29,1493.28 2364.62,1459.94 2397.96,1493.28 2364.62,1526.61 2331.29,1493.28 ; 2331.29,1626.61 2347.96,1626.61 2347.96,1609.94 2381.29,1609.94 2381.29,1626.61 2397.96,1626.61 2397.96,1659.94 2381.29,1659.94 2381.29,1676.61 2347.96,1676.61 2347.96,1659.94 2331.29,1659.94 2331.29,1626.61 ; 2331.29,1776.61 2347.96,1776.61 2364.62,1759.94 2381.29,1776.61 2397.96,1776.61 2381.29,1793.28 2397.96,1809.94 2381.29,1809.94 2364.62,1826.61 2347.96,1809.94 2331.29,1809.94 2347.96,1793.28 2331.29,1776.61 ; 2331.29,1909.94 2364.62,1926.61 2397.96,1909.94 2381.29,1943.28 2397.96,1976.61 2364.62,1959.94 2331.29,1976.61 2347.96,1943.28 2331.29,1909.94 ; 2331.29,2126.61 2397.96,2126.61 2364.62,2059.94 2331.29,2126.61 ; 2331.29,2359.94 2397.96,2359.94 2397.96,2426.61 2331.29,2426.61 2331.29,2359.94
  lines w15: 2271.5,1264.94 17349.18,1264.94 ; 2271.5,2464.94 17349.18,2464.94 ; 2822.38,1114.94 2822.38,2614.94 ; 3422.22,1114.94 3422.22,2614.94 ; 4521.9,1114.94 4521.9,2614.94 ; 5027.77,1114.94 5027.77,2614.94 ; 5761.57,1114.94 5761.57,2614.94 ; 7261.13,1114.94 7261.13,2614.94 ; 7850.97,1114.94 7850.97,2614.94 ; 8596.77,1114.94 8596.77,2614.94 ; 11275.94,1114.94 11275.94,2614.94 ; 12129.7,1114.94 12129.7,2614.94 ; 13463.31,1114.94 13463.31,2614.94 ; 14796.92,1114.94 14796.92,2614.94 ; 15946.58,1114.94 15946.58,2614.94 ; 2271.5,1114.94 17349.18,1114.94 17349.18,2614.94 2271.5,2614.94 2271.5,1114.94
  text "Symbol" at 2361.5,2509.94 h72
  text "Count" at 2867.38,2509.94 h72
  text "Hole Size" at 3467.22,2509.94 h72
  text "Plated" at 4566.9,2509.94 h72
  text "Hole Type" at 5072.77,2509.94 h72
  text "Drill Layer Pair" at 5806.57,2509.94 h72
  text "Via/Pad" at 7306.13,2509.94 h72
  text "Pad Shape" at 7895.97,2509.94 h72
  text "Template" at 8641.77,2509.94 h72
  text "Description" at 11320.94,2509.94 h72
  text "Hole Tolerance (+)" at 12174.7,2509.94 h72
  text "Hole Tolerance (-)" at 13508.31,2509.94 h72
  text "Hole Length" at 14841.92,2509.94 h72
  text "Routed Path Length" at 15991.58,2509.94 h72
  text "2" at 2867.38,2359.94 h60
  text "23.62mil (0.600mm)" at 3467.22,2359.94 h60
  text "PTH" at 4566.9,2359.94 h60
  text "Slot" at 5072.77,2359.94 h60
  text "Top Layer - Bottom Layer" at 5806.57,2359.94 h60
  text "Pad" at 7306.13,2359.94 h60
  text "Rounded" at 7895.97,2359.94 h60
  text "r90_170h60_140r100" at 8641.77,2359.94 h60
  text "55.12mil (1.400mm)" at 14841.92,2359.94 h60
  text "31.50mil (0.800mm)" at 15991.58,2359.94 h60
  text "2" at 2867.38,2209.94 h60
  text "23.62mil (0.600mm)" at 3467.22,2209.94 h60
  text "PTH" at 4566.9,2209.94 h60
  text "Slot" at 5072.77,2209.94 h60
  text "Top Layer - Bottom Layer" at 5806.57,2209.94 h60
  text "Pad" at 7306.13,2209.94 h60
  text "Rounded" at 7895.97,2209.94 h60
  text "(Mixed)" at 8641.77,2209.94 h60
  text "66.93mil (1.700mm)" at 14841.92,2209.94 h60
  text "43.31mil (1.100mm)" at 15991.58,2209.94 h60
  text "2" at 2867.38,2059.94 h60
  text "24.41mil (0.620mm)" at 3467.22,2059.94 h60
  text "NPTH" at 4566.9,2059.94 h60
  text "Round" at 5072.77,2059.94 h60
  text "Top Layer - Bottom Layer" at 5806.57,2059.94 h60
  text "Pad" at 7306.13,2059.94 h60
  text "Rounded" at 7895.97,2059.94 h60
  text "c0hn62" at 8641.77,2059.94 h60
  text "-" at 14841.92,2059.94 h60
  text "-" at 15991.58,2059.94 h60
  text "2" at 2867.38,1909.94 h60
  text "35.43mil (0.900mm)" at 3467.22,1909.94 h60
  text "PTH" at 4566.9,1909.94 h60
  text "Slot" at 5072.77,1909.94 h60
  text "Top Layer - Bottom Layer" at 5806.57,1909.94 h60
  text "Pad" at 7306.13,1909.94 h60
  text "Rounded" at 7895.97,1909.94 h60
  text "r150_250h90_180r100m155_255mx155_255p150_250" at 8641.77,1909.94 h60
  text "70.87mil (1.800mm)" at 14841.92,1909.94 h60
  text "35.43mil (0.900mm)" at 15991.58,1909.94 h60
  text "2" at 2867.38,1759.94 h60
  text "35.43mil (0.900mm)" at 3467.22,1759.94 h60
  text "PTH" at 4566.9,1759.94 h60
  text "Slot" at 5072.77,1759.94 h60
  text "Top Layer - Bottom Layer" at 5806.57,1759.94 h60
  text "Pad" at 7306.13,1759.94 h60
  text "Rounded" at 7895.97,1759.94 h60
  text "r150_330h90_270r100m155_335mx155_335p150_330" at 8641.77,1759.94 h60
  text "106.29mil (2.700mm)" at 14841.92,1759.94 h60
  text "70.86mil (1.800mm)" at 15991.58,1759.94 h60
  text "2" at 2867.38,1609.94 h60
  text "78.74mil (2.000mm)" at 3467.22,1609.94 h60
  text "NPTH" at 4566.9,1609.94 h60
  text "Round" at 5072.77,1609.94 h60
  text "Top Layer - Bottom Layer" at 5806.57,1609.94 h60
  text "Pad" at 7306.13,1609.94 h60
  text "Rounded" at 7895.97,1609.94 h60
  text "c250hn200m255" at 8641.77,1609.94 h60
  text "-" at 14841.92,1609.94 h60
  text "-" at 15991.58,1609.94 h60
  text "96" at 2867.38,1459.94 h60
  text "7.87mil (0.200mm)" at 3467.22,1459.94 h60
  text "PTH" at 4566.9,1459.94 h60
  text "Round" at 5072.77,1459.94 h60
  text "Top Layer - Bottom Layer" at 5806.57,1459.94 h60
  text "Via" at 7306.13,1459.94 h60
  text "Rounded" at 7895.97,1459.94 h60
  text "(Mixed)" at 8641.77,1459.94 h60
  text "-" at 14841.92,1459.94 h60
  text "-" at 15991.58,1459.94 h60
  text "130" at 2867.38,1309.94 h60
  text "11.81mil (0.300mm)" at 3467.22,1309.94 h60
  text "PTH" at 4566.9,1309.94 h60
  text "Round" at 5072.77,1309.94 h60
  text "Top Layer - Bottom Layer" at 5806.57,1309.94 h60
  text "Via" at 7306.13,1309.94 h60
  text "Rounded" at 7895.97,1309.94 h60
  text "(Mixed)" at 8641.77,1309.94 h60
  text "-" at 14841.92,1309.94 h60
  text "-" at 15991.58,1309.94 h60
  text "238 Total" at 2867.38,1159.94 h60
  text "Slot definitions :" at 2361.5,1014.97 h60
  text "Routed Path Length" at 3394.19,1014.97 h60
  text "= Calculated from tool start centre position to tool end centre position." at 4496.86,1014.97 h60
  text "Hole Length" at 3394.19,914.99 h60
  text "= Routed Path Length + Tool Size = Slot length as defined in the PCB layout" at 4086.99,914.99 h60

## Dimensions
-57,1343 to -57,-57 on Dimensions
-57,1343 to 1986,1343 on Dimensions

## Text inside footprints (layer, text, board x,y; h text height)
J1: Top Overlay "PCB Edge" at 1957.04,481.31 h31.5 r90
J3: Top Overlay "1" at 1643.98,-42.59 h11.81; Top Overlay "40" at 1919.72,69.86 h11.81